# Altium PCB A3000_PSU.PcbDoc
Units mm, origin at the board's own origin, x right, y up, seen from the top; angles counter-clockwise.
Board outline 146 x 100 mm, 2 copper layers (Top Layer, Bottom Layer), stack 1.671 mm thick; 5 components, 7 nets, 21 pads, 0 vias.
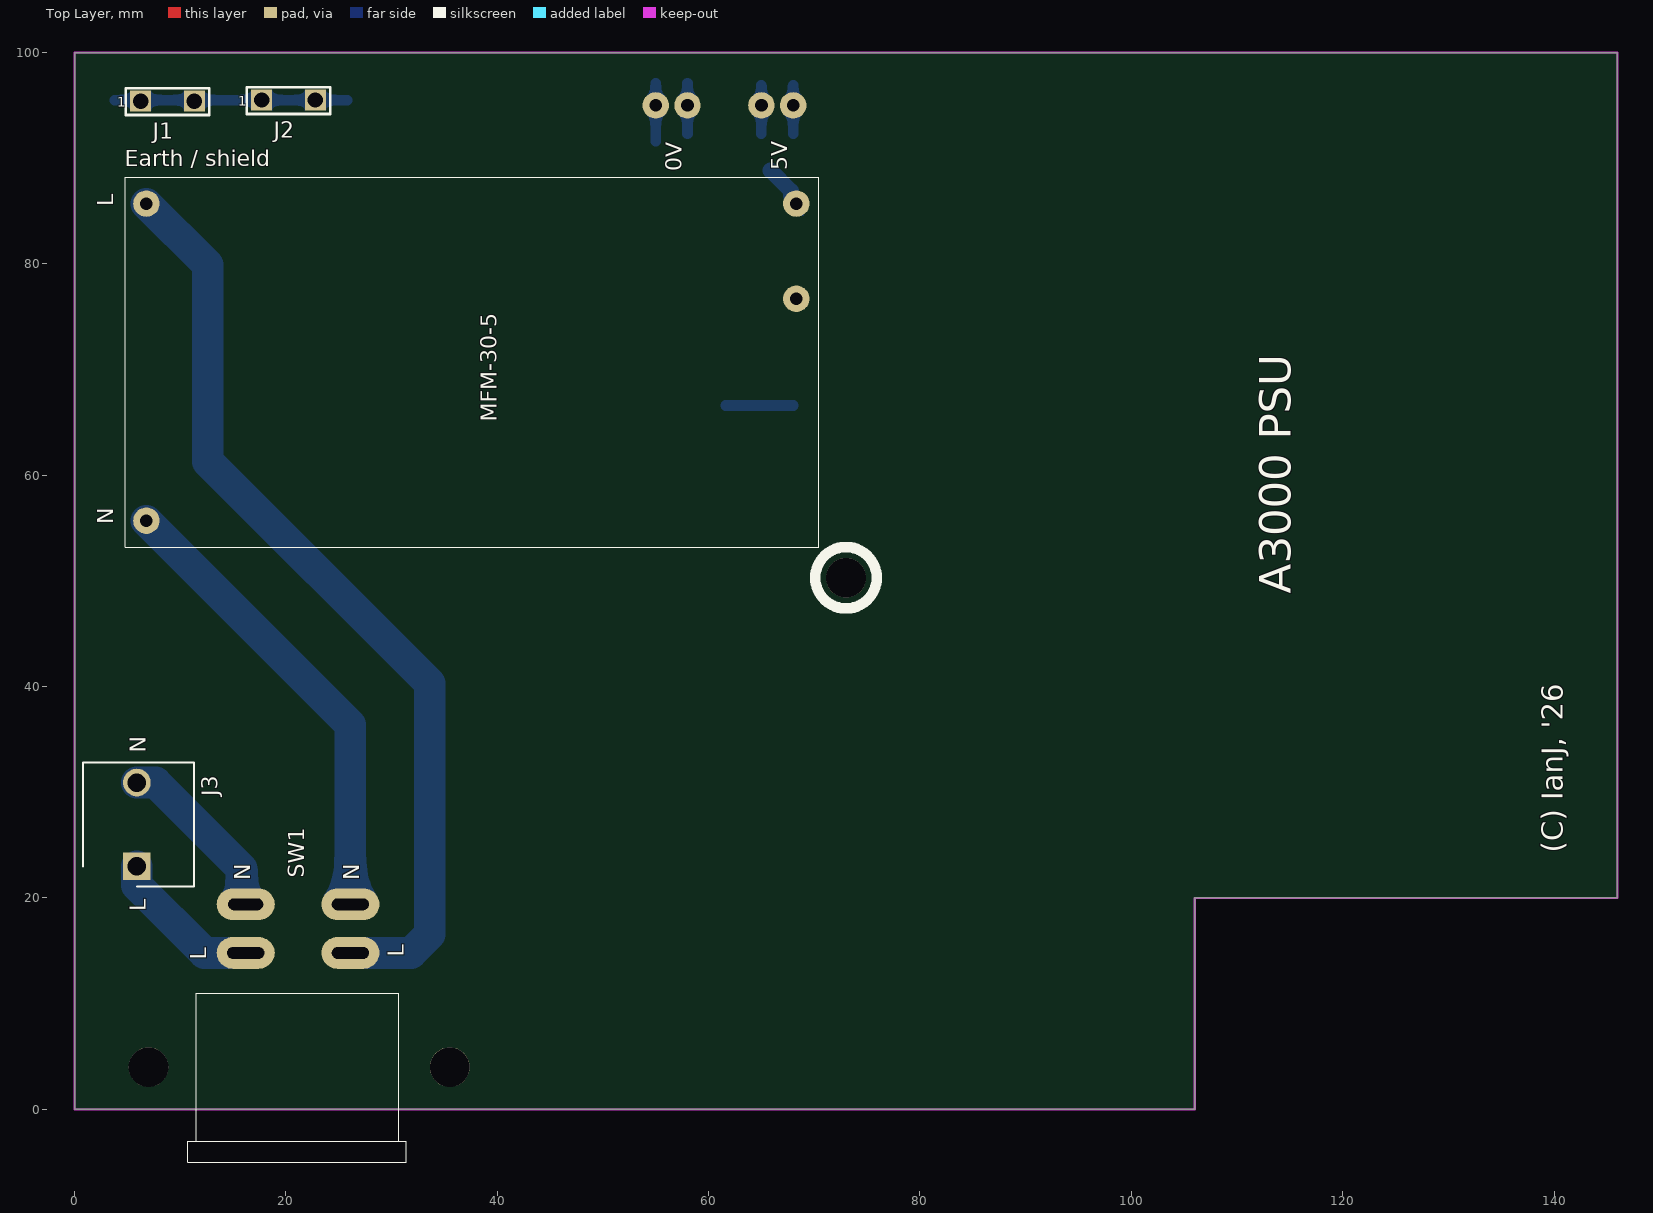
[diagram p0: Top Layer view]
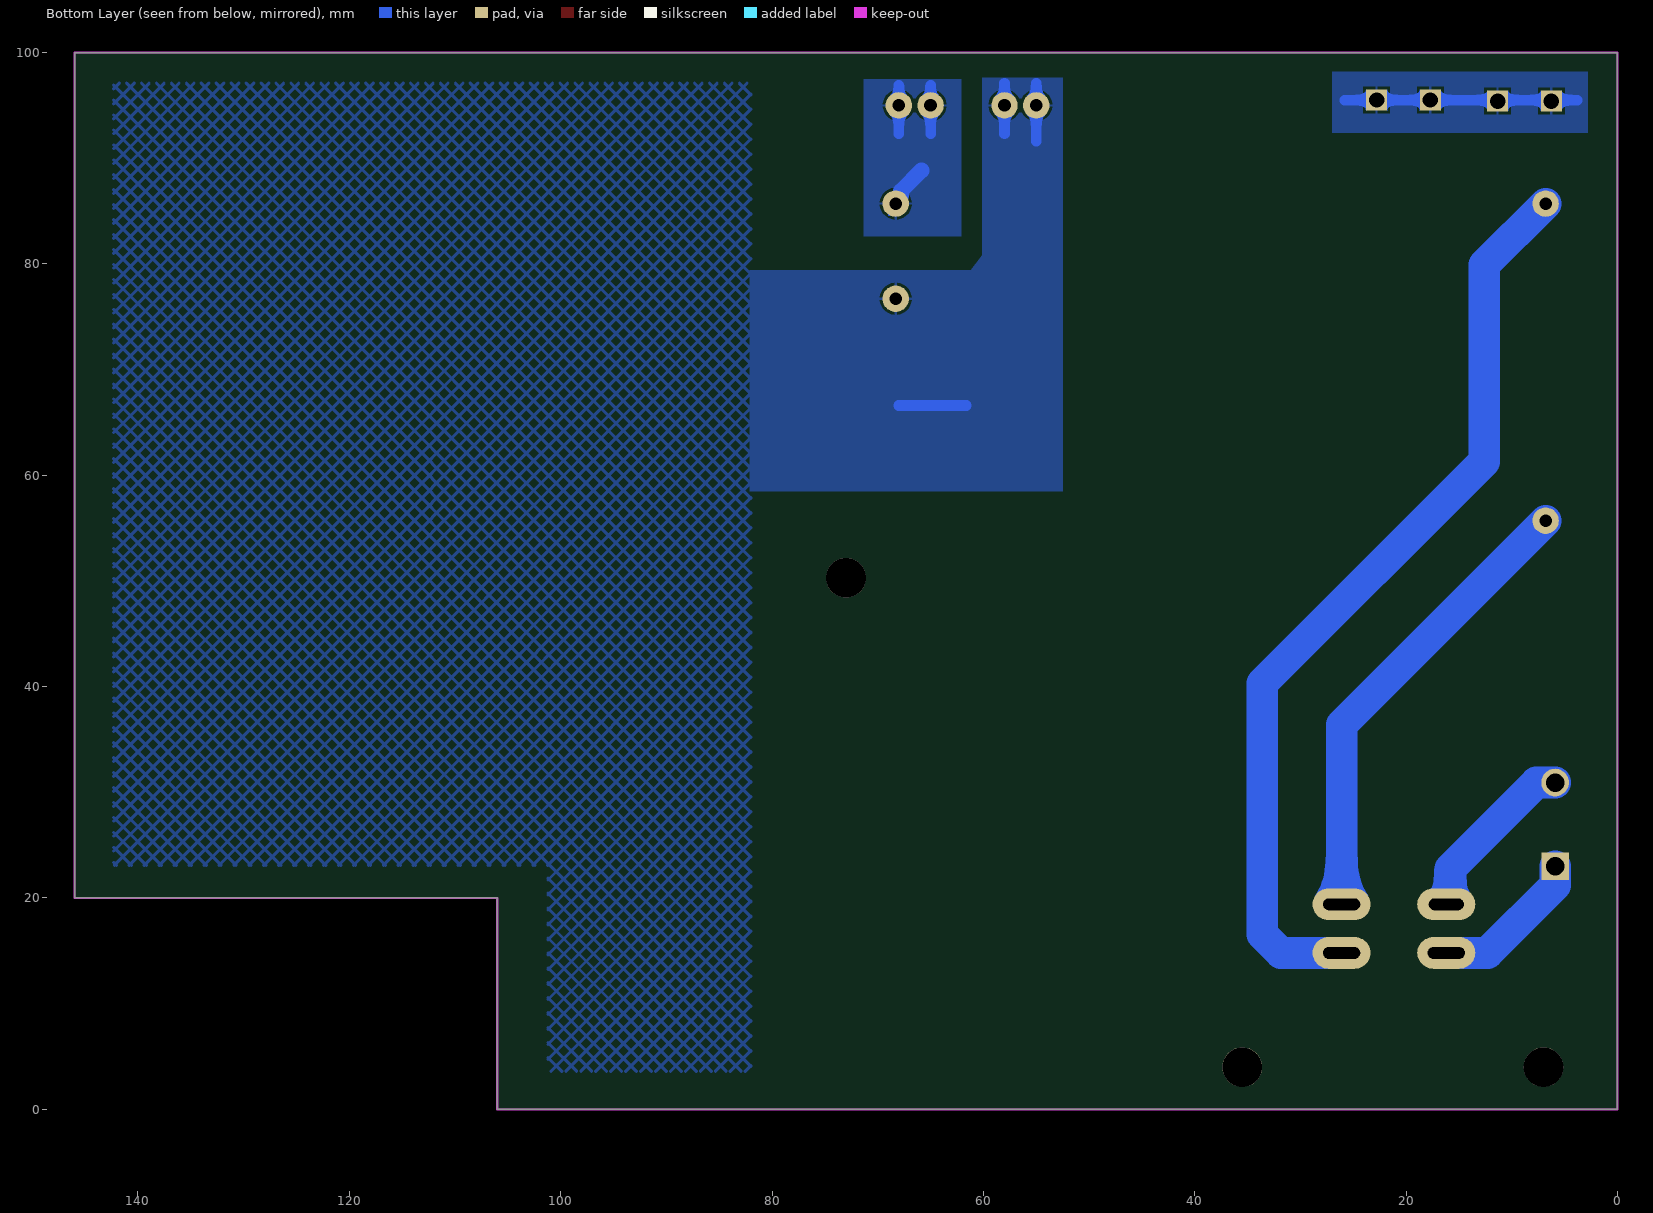
[diagram p1: Bottom Layer view, seen from below]
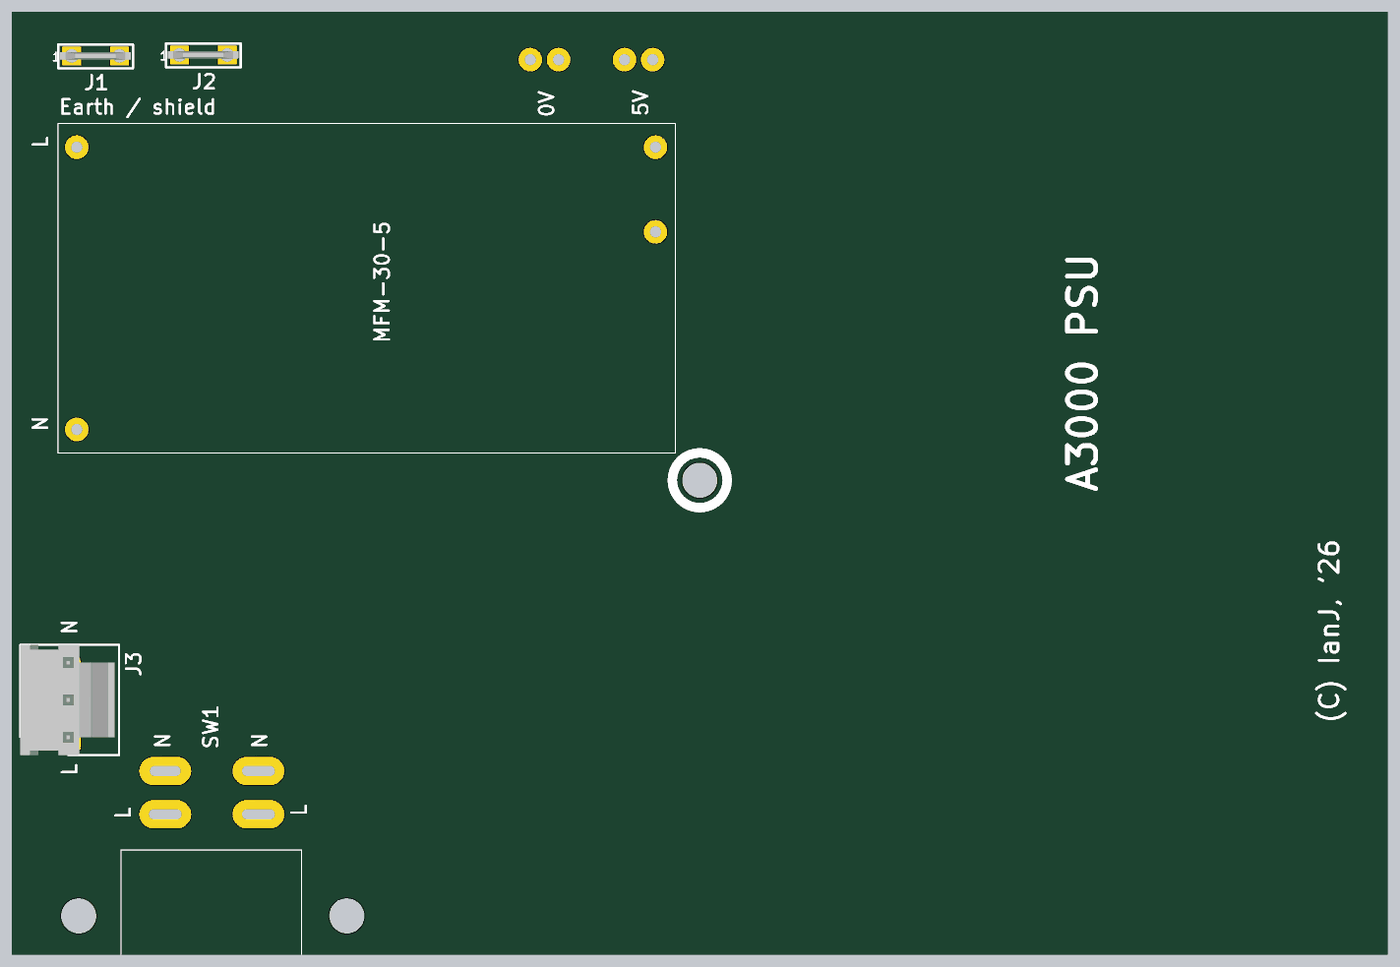
[diagram p2: 3D render of the assembled board from above, using the file's embedded part models]

## Layer stack, top to bottom
Top Solder: solder mask 0.0102, Solder Resist, Dk 3.5
Top Layer: signal copper 0.0356
Dielectric 1: dielectric 0.2, FR-4, Dk 4.8
Dielectric 2: core 1.2, PP-006, Dk 4.1
Dielectric2: dielectric 0.2, FR-4, Dk 4.8
Bottom Layer: signal copper 0.0356
Bottom Solder: solder mask 0.0102, Solder Resist, Dk 3.5

## Board outline
106,0 106,20 146,20 146,100 0,100 0,0

## Design rules (kind name [scope] priority, off if disabled: settings)
Clearance [All] p1: gap=0.254 ignorepadtopadclearanceinfootprint=FALSE except(0: Arc-Hole Track-Hole SMDPad-Hole THPad-Hole Via-Hole Fill-Hole Poly-Hole Region-Hole Text-Hole)
PolygonConnect [All] p1: connectstyle=Relief reliefconductorwidth=0.254 reliefentries=4 polygonreliefangle="90 Angle" airgapwidth=0.254
RoutingVias [All] p1: holewidth=0.711 width=1.27 viastyle="Through Hole" minholewidth=0.711 minwidth=1.27 maxholewidth=0.711 maxwidth=1.27
SolderMaskExpansion [All] p1: expansion=0.102 istentingtop=FALSE
SupplyNets "Schematic Supply Nets_2" [InNet('GND')] p1: voltage=0.000
SupplyNets "Schematic Supply Nets_1" [InNet('VDC')] p2: voltage=0.000
SupplyNets "Schematic Supply Nets" [InNet('EARTH')] p3: voltage=0.000
Width [All] p1: maxlimit=5 minlimit=0.254 preferedwidth=1
30 further rules are at their usual default settings.

## Components (designator, comment, footprint, x,y, rotation, side; value= is the part's Value field where it differs from the comment)
J1 "62409-1" 62409-1 8.8,95.4 r0 top
J2 "62409-1" 62409-1 20.25,95.5 r0 top
J3 "26-60-4030" SHDR3W155P0X396_1X3_NoMiddle 5.9,23 r270 top
MFM-30-5 "" MFM-30-5 4.8,53.2 r0 top
SW1 "DPST_SW" SWITCH_RS_180-84 11.5,-3 r0 top

## Footprints (in the part's own frame and the unit in brackets; to place one, negate y for a bottom-side part, rotate by r counter-clockwise, add the part's x,y. Pads: shape width x height; smd on the part's side, far side on the other; paste and mask are expansions set on the pad)
62409-1 [mm] "PCB Terminal, 6.35mm x 0.81mm, 0.25\" x 0.032\", Brass, 1.4 mm, Tin"
  rect 2x2 hole 1.45: 1(-2.54,0) 2(2.54,0)
  silkscreen extent -3.97,-1.32 3.96,1.22, body extent -3.76,-0.4 3.73,0.4, height 12.5
MFM-30-5 [mm]
  round 2.5 hole 1.2: ACL(2,32.5) ACN(2,2.5) GND(63.5,23.5) VDC(63.5,32.5)
  silkscreen extent 0,0 65.6,35
SHDR3W155P0X396_1X3_NoMiddle [mm]
  rect 2.625x2.625 hole 1.75: 1(0,0)
  round 2.625 hole 1.75: 3(-7.92,0)
  silkscreen extent -9.82,-5.11 1.91,5.41, body extent -9.82,-5.11 1.92,4.89, height 14.7
SWITCH_RS_180-84 [mm]
  oval 5.5x3 hole 1.1 slot 3.5 at 0 deg: ACL(14.6,17.8) ACN(14.6,22.4) L(4.7,17.8)
  oval 5.5x3 hole 1.1 slot 3.3 at 0 deg: N(4.7,22.4)
  silkscreen extent -0.8,-2 19.9,14

## Part data
J1 J2: library part 982-0022, "PCB Terminal, 6.35mm x 0.81mm, 0.25\" x 0.032\", Brass, 1.4 mm, Tin", Disti Part Number=892609, Manufacturer="TE Coonectivity", Max Current=24A, ComponentLink1Description=Datasheet, ComponentLink1URL=Z:\HW_Common\A2E_Datasheets\TEConnectivity\1861797.pdf, Component Type=Standard, Cost(£)=0.807, Distributer=Farnell, ManuPart=62409-1, Part Number=982-0022, RoHS Compliant=YES
J3: library part 26-60-4030_NoMiddle, "Connector", Manufacturer_Name=Molex, Mouser Part Number=538-26-60-4030, Datasheet Link=https://componentsearchengine.com/Datasheets/2/26-60-4030.pdf, Height=15.36mm, Manufacturer_Part_Number=26-60-4030, Mouser Price/Stock=https://www.mouser.co.uk/ProductDetail/Molex/26-60-4030?qs=jcz9%252BeLWjlgPf3deDPDuUA%3D%3D
MFM-30-5: library part MFM-30-5

## Free pads (board coordinates)
  round 3.75 hole 3.75 unplated: 1(7,4) 1(35.5,4) 1(73,50.3)
  round 2.5 hole 1.2: GND(55,95) GND(58,95) VDC(65,95) VDC(68,95)

## Nets (pads, with @x,y where several pads share a name; then routed paths per layer and width w, separated by ;. In a path a pad name is that pad's centre, name@x,y a point inside that pad or via, vN(x,y) a via of type N, cw(c..) or ccw(c..) an arc to the next point about the centre after c; other vN are vias at no path point)
ACL: MFM-30-5.ACL SW1.ACL | length 89.1
  Bottom Layer w3: MFM-30-5.ACL 12.6,79.9 12.6,61.3 33.6,40.3 33.6,16.557 31.843,14.8 SW1.ACL@25.485,14.8
ACN: MFM-30-5.ACN SW1.ACN | length 44.3
  Bottom Layer w3: MFM-30-5.ACN 26.1,36.4 SW1.ACN
EARTH: J1.1 J1.2 J2.1 J2.2 | length 22.1
  Bottom Layer w0.254: 3.7,95.4 3.8,95.5
  Bottom Layer w1: 3.8,95.5 25.8,95.5
GND: MFM-30-5.GND pad.GND | length 16.9
  Bottom Layer w0.254: 61.5,66.473 61.627,66.6
  Bottom Layer w1: 55,91.6 55,95 55,97.1 ; 58,92.3 58,95 58,97.1 ; 61.627,66.6 64.4,66.6 68,66.6
L: J3.1 SW1.L | length 15.5
  Bottom Layer w3: J3.1 5.9,21.2 12.3,14.8 SW1.L@16.909,14.8
N: J3.3 SW1.N | length 17
  Bottom Layer w3: J3.3 7.68,30.92 15.832,22.768 15.832,19.4 SW1.N
VDC: MFM-30-5.VDC pad.VDC | length 14.4
  Bottom Layer w0.254: MFM-30-5.VDC@67.921,84.679 68.001,84.76 68.827,84.76 MFM-30-5.VDC@68.908,84.679
  Bottom Layer w1: 65,92.3 65,96.9 ; 68,92.3 68,96.9
  Bottom Layer w1.5: 65.857,88.843 67.8,86.9 67.8,86.471 68.3,85.971 MFM-30-5.VDC

## Polygon pours and split planes (outlines as drawn)
GND on Bottom Layer "NONET_L-01_P-001" (hatched 45Degree grid 1 track 0.3, pour order 4): 82,97.1 142.3,97.1 142.3,23.1 101.2,23.1 101.2,3.6 82.1,3.6 82,3.5
EARTH on Bottom Layer "EARTH" (solid, remove dead copper, pour order 0): 2.8,98.2 27,98.2 27,92.4 2.8,92.4
VDC on Bottom Layer "NONET_L-01_P-001" (solid, remove dead copper, pour order 2): 62.1,97.454 71.3,97.454 71.3,82.6 62.1,82.6
GND on Bottom Layer "NONET_L-01_P-001" (solid, remove dead copper, pour order 1): 82.1,58.5 82.1,79.4 61.2,79.4 60.1,80.827 60.1,97.6 52.5,97.6 52.5,58.5

## Keep-outs
Keep-Out Layer:
  the board outline again, w0.203

## Silkscreen, mask and mechanical layers (free items; w line width, h text height)
Top Overlay:
  circle w1: c73,50.3 r2.907
  text "Earth / shield" at 4.754,89.254 h1.52
  text "5V" at 67.446,88.854 h1.52 r90
  text "0V" at 57.446,88.754 h1.52 r90
  text "L" at 3.646,85.454 h1.52 r90
  text "N" at 3.646,55.354 h1.52 r90
  text "A3000 PSU" at 115.1,48.8 h3 r90
  text "N" at 6.746,33.754 h1.52 r90
  text "(C) IanJ, '26" at 140.834,24.3 h2 r90
  text "N" at 16.646,21.654 h1.52 r90
  text "N" at 26.946,21.654 h1.52 r90
  text "L" at 6.746,18.754 h1.52 r90
  text "L" at 31.146,14.454 h1.52 r90
  text "L" at 12.446,14.154 h1.52 r90
Board Shape:
  the board outline again, w0.203

## Text inside footprints (layer, text, board x,y; h text height)
J1: Top Overlay "1" at 4.06,94.875 h0.91
J2: Top Overlay "1" at 15.51,94.975 h0.91